# Altium PCB Audio_Meter_V4.5.PcbDoc (part 4 of 5)
Units mil, origin at the board's own origin, x right, y up, seen from the top; angles counter-clockwise.
Board outline 2756.14 x 2519.69 mil, 2 copper layers (Top Layer, Bottom Layer), stack 57.087 mil thick; 109 components, 62 nets, 315 pads, 566 vias.
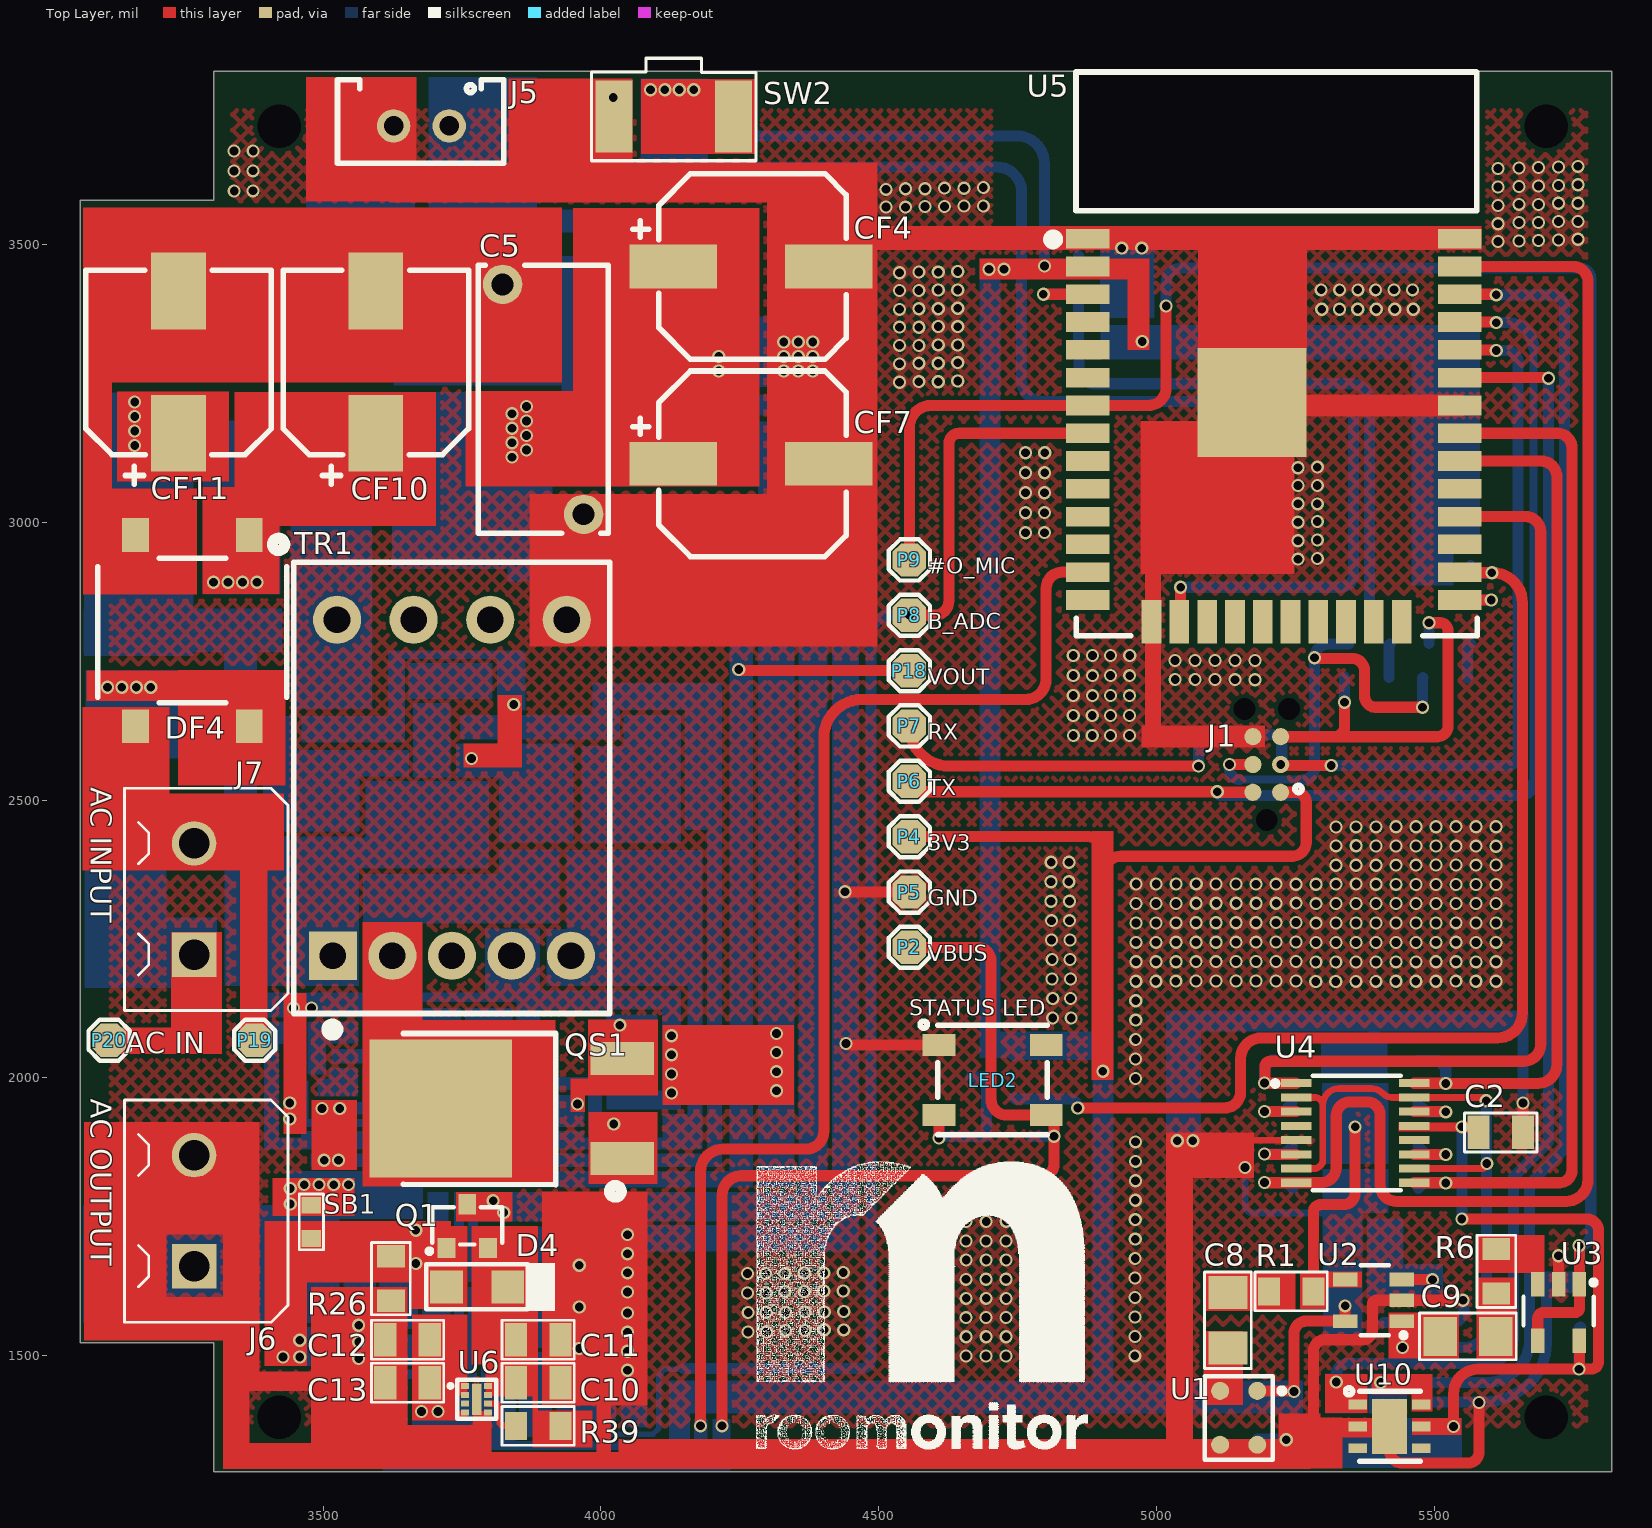
[diagram p0: Top Layer view]

## Part data (continued)
U4: "IC SWITCH QUAD SPST 16TSSOP", Case/Package=TSSOP, High Level Output Current=30mA, MANUFACTURER="Analog Devices", Max Operating Temperature=85°C, Max Power Dissipation=5uW, Max Supply Current=1uA, Max Supply Voltage=5.5V, Min Operating Temperature=-40°C, Min Supply Voltage=1.8V, On-State Resistance=4R, Operating Supply Current=1nA, Package Quantity=1, Power Dissipation=430mW, Supplier Part Number 1=ADG712BRUZ-REELCT-ND, -3db Bandwidth=200MHz, Bandwidth=200MHz, ComponentLink1Description=http://www.analog.com/media/en/technical-documentation/data-sheets/ADG711_712_713.pdf?src-supplier=Digi-Key, ComponentLink1URL=http://www.analog.com/media/en/technical-documentation/data-sheets/ADG711_712_713.pdf?src-supplier=Digi-Key, ComponentLink2Description=http://datasheet.iiic.cc/analog_devices/ADG712BRUZ-REEL.pdf?src-supplier=IIIC, ComponentLink2URL=http://datasheet.iiic.cc/analog_devices/ADG712BRUZ-REEL.pdf?src-supplier=IIIC, Contact Plating=Tin,Matte, Interface=Parallel, Lead Free="Contains Lead", Manufacturer Part Number=ADG712BRUZ-REEL, Mount="Surface Mount", Number of Bits=4, Number of Channels=4, Number of Circuits=4, Number of Inputs=4, Number of Outputs=4, Number of Pins=16, Packaging="Tape and Reel", Polarity=Non-Inverting, Pricing 1="1=2.89, 10=2.598, 25=2.4564, 100=2.129, 250=2.01984, 500=1.81238, 1000=1.52852 (USD)", Stock 1=4085, Supplier 1=Digi-Key, Supply Type=Single, Throw Configuration=SPST, Turn-Off Delay Time=6ns, Turn-On Delay Time=11ns
U5: "WIFI MODULE 128MBITS SPI FLASH", Case/Package=SMD/SMT, Frequency=2.5GHz, MANUFACTURER="Espressif Systems", Manufacturer Part Number=ESP32-WROOM-32D(16MB), Max Operating Temperature=85°C, Min Operating Temperature=-40°C, Supplier Part Number 1=356-ES32WROOM32D16MB, ComponentLink1Description=https://www.espressif.com/sites/default/files/documentation/esp32-wroom-32d_esp32-wroom-32u_datasheet_en.pdf?src-supplier=Digi-Key, ComponentLink1URL=https://www.espressif.com/sites/default/files/documentation/esp32-wroom-32d_esp32-wroom-32u_datasheet_en.pdf?src-supplier=Digi-Key, Data Rate=150Mbps, Interface=I2C,SPI,GPIO,PWM,SDIO,UART, Memory Size=536KB, Mount="Surface Mount", Packaging="Tape and Reel", Pricing 1="1=4.5, 5=4.5 (USD)", Sensitivity=-98dBm, Stock 1=3620, Supplier 1=Mouser
U6: "IC REG LINEAR 3.3V 1A 8XDFN", Dropout Voltage=95mV, MANUFACTURER="ON Semiconductor", Max Operating Temperature=125°C, Min Current Limit=1.1A, Min Operating Temperature=-40°C, Output Current=1A, Output Voltage=3.3V, Supplier Part Number 1=NCP186AMX330TAGOSCT-ND, ComponentLink1Description=http://www.farnell.com/datasheets/2236905.pdf?src-supplier=Farnell, ComponentLink1URL=http://www.farnell.com/datasheets/2236905.pdf?src-supplier=Farnell, ComponentLink2Description=http://www.farnell.com/datasheets/2236905.pdf?src-supplier=Newark, ComponentLink2URL=http://www.farnell.com/datasheets/2236905.pdf?src-supplier=Newark, ComponentLink3Description=http://www.onsemi.com/pub/Collateral/NCP186-D.PDF?src-supplier=Digi-Key, ComponentLink3URL=http://www.onsemi.com/pub/Collateral/NCP186-D.PDF?src-supplier=Digi-Key, ComponentLink4Description=https://www.onsemi.com/pub/Collateral/NCP186-D.PDF?src-supplier=Digi-Key, ComponentLink4URL=https://www.onsemi.com/pub/Collateral/NCP186-D.PDF?src-supplier=Digi-Key, Lead Free="Lead Free", Manufacturer Part Number=NCP186AMX330TAG, Mount="Surface Mount", Number of Pins=8, Number of Regulators=1, Packaging="Tape and Reel", Pricing 1="1=0.48, 10=0.39, 25=0.3564, 100=0.2405, 250=0.199, 500=0.18242, 1000=0.13682 (USD)", Stock 1=5995, Supplier 1=Digi-Key
U7: "IC BAT CHG LI-ION 1 CELL SOT23-6", Battery Pack Voltage=4.2V, Case/Package=SOT-23-6, MANUFACTURER="Texas Instruments", Max Charge Current=800mA, Max Operating Temperature=125°C, Max Supply Voltage=6.45V, Min Operating Temperature=0°C, Supplier Part Number 1=296-47315-1-ND, ComponentLink1Description=http://www.ti.com/lit/ds/symlink/bq21040.pdf?src-supplier=Digi-Key, ComponentLink1URL=http://www.ti.com/lit/ds/symlink/bq21040.pdf?src-supplier=Digi-Key, ComponentLink2Description=http://www.ti.com/general/docs/suppproductinfo.tsp?distId=10&gotoUrl=http%3A%2F%2Fwww.ti.com%2Flit%2Fgpn%2Fbq21040&src-supplier=Digi-Key, ComponentLink2URL=http://www.ti.com/general/docs/suppproductinfo.tsp?distId=10&gotoUrl=http%3A%2F%2Fwww.ti.com%2Flit%2Fgpn%2Fbq21040&src-supplier=Digi-Key, ComponentLink3Description=http://www.ti.com/general/docs/suppproductinfo.tsp?distId=10&amp;gotoUrl=http%3A%2F%2Fwww.ti.com%2Flit%2Fgpn%2Fbq21040&src-supplier=Digi-Key, ComponentLink3URL=http://www.ti.com/general/docs/suppproductinfo.tsp?distId=10&amp;gotoUrl=http%3A%2F%2Fwww.ti.com%2Flit%2Fgpn%2Fbq21040&src-supplier=Digi-Key, Differential Output=No, Fault Protection="Over Voltage,Over Temperature,Short Circuit", Interface=USB,SPI, Lead Free="Lead Free", Manufacturer Part Number=BQ21040DBVR, Mount="Surface Mount", Number of Bits=16, Number of Cells=1, Number of D/A Converters=4, Output Type="Analog Current/Voltage", Packaging="Cut Tape", Pricing 1="1=1.14, 10=1.015, 100=0.7396, 500=0.61924, 1000=0.48163 (USD)", Settling Time=30us, Stock 1=5958, Supplier 1=Digi-Key
U10: "SENS HUMID/TEMP 3.6V I2C 2% 6DFN", MANUFACTURER="Silicon Labs", Max Operating Temperature=85°C, Min Operating Temperature=-40°C, Supplier Part Number 1=336-4380-1-ND, Accuracy=3%, ComponentLink1Description=https://www.silabs.com/Support%20Documents/TechnicalDocs/Si7021-A20.pdf?src-supplier=Avnet, ComponentLink1URL=https://www.silabs.com/Support%20Documents/TechnicalDocs/Si7021-A20.pdf?src-supplier=Avnet, ComponentLink2Description=https://www.silabs.com/documents/public/data-sheets/Si7021-A20.pdf?src-supplier=Newark, ComponentLink2URL=https://www.silabs.com/documents/public/data-sheets/Si7021-A20.pdf?src-supplier=Newark, ComponentLink3Description=https://www.silabs.com/Support%20Documents%2fTechnicalDocs%2fSi7021-A20.pdf?src-supplier=Digi-Key, ComponentLink3URL=https://www.silabs.com/Support%20Documents%2fTechnicalDocs%2fSi7021-A20.pdf?src-supplier=Digi-Key, ComponentLink4Description=https://www.silabs.com/Support%20Documents/TechnicalDocs/Si7021-A20.pdf?src-supplier=Avnet+Asia, ComponentLink4URL=https://www.silabs.com/Support%20Documents/TechnicalDocs/Si7021-A20.pdf?src-supplier=Avnet+Asia, ComponentLink5Description=https://www.silabs.com/documents/public/data-sheets/Si7021-A20.pdf?src-supplier=Digi-Key, ComponentLink5URL=https://www.silabs.com/documents/public/data-sheets/Si7021-A20.pdf?src-supplier=Digi-Key, ComponentLink6Description=https://www.silabs.com/documents/public/data-sheets/Si7021-A20.pdf?src-supplier=Farnell, ComponentLink6URL=https://www.silabs.com/documents/public/data-sheets/Si7021-A20.pdf?src-supplier=Farnell, Manufacturer Part Number=SI7021-A20-GM1R, Mount="Surface Mount", Output Type=I2C,Digital, Pricing 1="1=3.37, 25=3.2436, 100=3.2313 (USD)", Response Time=18s, Sensor Type=Temperature, Stock 1=8770, Supplier 1=Digi-Key

## Free pads (board coordinates)
  round 60 hole 78.74 unplated: MH2(3421.11,1389.43) MH3(3421.11,3712.26) MH3(5700.87,1389.43) MH3(5700.87,3712.26)

## Via types
v1: diameter 23.62, hole 15.75, Top Layer to Bottom Layer, 566 vias